# Altium PCB NB3000XN.PcbDoc (part 42 of 71)
Units mil, origin at the board's own origin, x right, y up, seen from the top; angles counter-clockwise.
Board outline 9527.56 x 6929.77 mil, 6 copper layers (Top Layer, GND+SHIELD, MidLayer1, MidLayer2, P2 - 3V3+5V0, Bottom Layer), stack 62.375 mil thick; 832 components, 1027 nets, 4655 pads, 4981 vias.
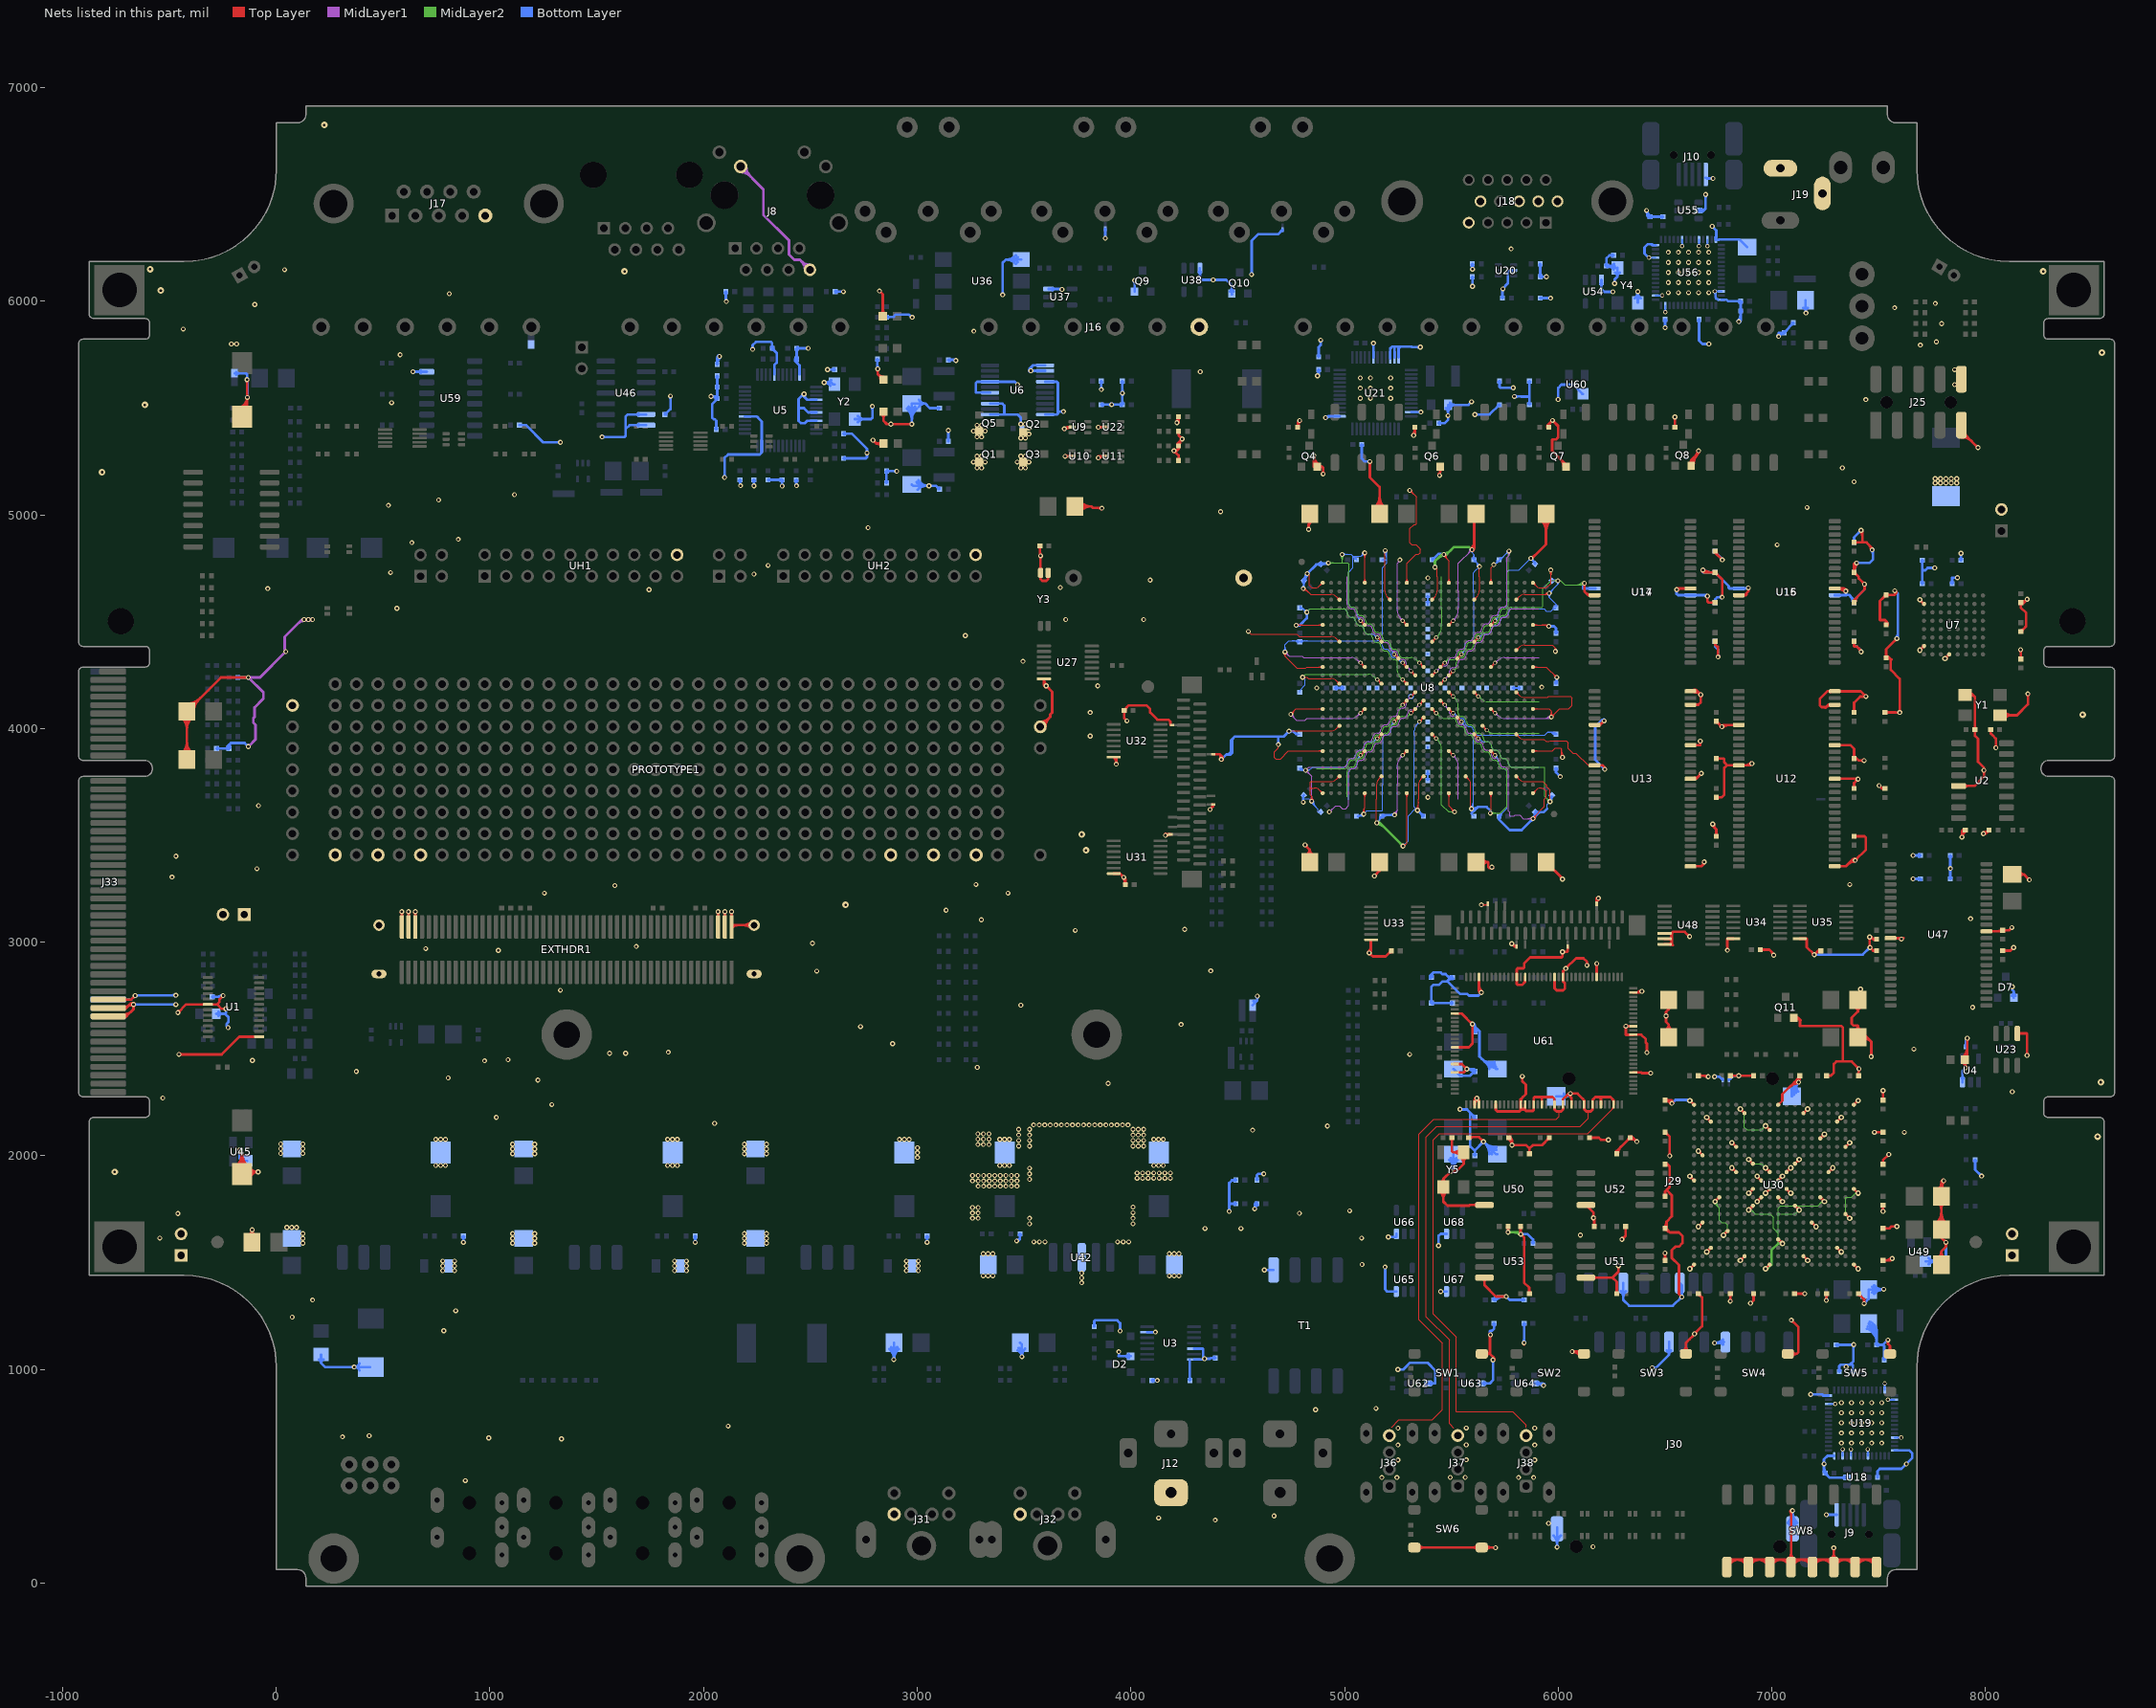
[diagram p46: the nets of this part, all layers, seen from the top]

## Via types
v1: diameter 23, hole 11.81, Top Layer to Bottom Layer, 3672 vias
v2: diameter 26, hole 11.81, Top Layer to Bottom Layer, 461 vias
v3: diameter 19, hole 11.81, Top Layer to Bottom Layer, tented both sides, 396 vias
v4: diameter 23.62, hole 11.81, Top Layer to Bottom Layer, 288 vias
v5: diameter 20, hole 11.81, Top Layer to Bottom Layer, 91 vias
v6: diameter 23, hole 11.81, Top Layer to Bottom Layer, tented both sides, 50 vias
v7: diameter 31, hole 11.81, Top Layer to Bottom Layer, 15 vias
v8: diameter 27.56, hole 11.81, Top Layer to Bottom Layer, tented both sides, 4 vias
v9: diameter 29, hole 11.81, Top Layer to Bottom Layer, 3 vias
v10: diameter 21, hole 11.81, Top Layer to Bottom Layer, 1 vias

## Nets (pads, with @x,y where several pads share a name; then routed paths per layer and width w, separated by ;. In a path a pad name is that pad's centre, name@x,y a point inside that pad or via, vN(x,y) a via of type N, cw(c..) or ccw(c..) an arc to the next point about the centre after c; other vN are vias at no path point) (continued)
GND: (continued)
  Top Layer w12: J33.A40@-785.98,2652.86 -701.48,2652.86 ; J33.A39@-785.98,2692.23 -701.48,2692.23 ; J33.A38@-785.98,2731.6 -678.25,2731.6 v1(-659.81,2750.04) ; J33.A39@-718.03,2688.12 ccw(c-713.87,2706.15) -700.79,2693.07 ; J33.A40@-717.08,2648.64 ccw(c-717.08,2676.13) -697.64,2656.69 ; J33.A40@-717.08,2660.64 ccw(c-717.08,2717.11) -677.16,2677.18 ; J33.A39@-715.33,2699.81 ccw(c-708.13,2731.03) -685.48,2708.37 ; J33.A38@-711.58,2726.1 cw(c-698.3,2712.82) -698.3,2731.6 cw(c-698.3,2750.38) J33.A38@-711.58,2737.1 ; J33.A40@-710.87,2648.18 cw(c-701.48,2641.09) -701.48,2652.86 ; J33.A40@-710.87,2657.54 ccw(c-701.48,2664.63) -701.48,2652.86 ; J33.A39@-710.87,2687.55 cw(c-701.48,2680.46) -701.48,2692.23 ; J33.A39@-710.87,2696.91 ccw(c-701.48,2704) -701.48,2692.23 ; -694.14,2699.71 cw(c-679.79,2685.36) v1@-670.63,2703.47 ; -686.64,2707.21 cw(c-668.14,2688.72) v1@-668.14,2714.87 ; -682.43,2711.42 cw(c-671.92,2700.91) v1@-665.21,2714.17 ; v1@-672.03,2712.26 cw(c-681.42,2721.65) -681.42,2708.37 cw(c-681.42,2695.1) -672.03,2704.49 cw(c-681.42,2695.1) -668.14,2695.1 cw(c-654.86,2695.1) v1@-664.25,2704.49 ; v1@-665.31,2750.04 cw(c-678.59,2750.04) -669.2,2740.65 cw(c-659.81,2731.26) v1@-659.81,2744.54 ; v4(-460,2670) -420.98,2709.02 U1.6@-320,2709.02 -276.78,2709.02 ; v4@-460,2675.81 ccw(c-460,2689.84) -450.08,2679.92 ccw(c-440.16,2670) v4@-454.19,2670 ; v4(-455,2475) -255,2475 -172.17,2557.83 U1.13@-79.84,2557.83 ; v4@-450.89,2470.89 cw(c-440.97,2460.97) -440.97,2475 cw(c-440.97,2489.03) v4@-450.89,2479.11 ; C191.2@-441.59,3882.53 ccw(c-498.56,3939.5) -417.99,3939.5 ; C3.2@-441.59,4052.47 cw(c-498.56,3995.5) -417.99,3995.5 cw(c-337.43,3995.5) C3.2@-394.4,4052.47 ; C191.2@-433.1,3874.05 ccw(c-469.58,3910.53) -417.99,3910.53 ccw(c-366.4,3910.53) C191.2@-402.88,3874.05 ; C3.2@-433.1,4060.95 cw(c-469.58,4024.47) -417.99,4024.47 cw(c-366.4,4024.47) C3.2@-402.88,4060.95 ; C191.2@-417.99,3855 -417.99,4041.71 -418.14,4041.71 -418.14,4080 -418.14,4083.07 -417.99,4083.22 C3.2@-417.99,4080 -258.62,4239.37 v1(-130.48,4239.37) ; -417.99,3939.5 ccw(c-337.43,3939.5) C191.2@-394.4,3882.53 ; C3.2@-417.99,4105.31 ccw(c-417.99,4166.4) -374.79,4123.2 ; C3.2@-417.99,4117.31 ccw(c-417.99,4207.37) -354.3,4143.69 ; C3.2@-396.62,4083.94 cw(c-354.53,4083.94) C3.2@-384.29,4113.7 ; C3.2@-384.62,4083.94 cw(c-313.56,4083.94) -363.81,4134.18 ; v1@-253.98,2750.04 cw(c-267.25,2750.04) -257.86,2740.65 cw(c-248.48,2731.26) v1@-248.48,2744.54 ; v1(-248.48,2750.04) -265.4,2733.12 -265.4,2720.4 -276.78,2709.02 ; v1@-238.36,2684.49 ccw(c-247.75,2675.1) -247.75,2688.37 ccw(c-247.75,2701.65) v1@-238.36,2692.26 ; v1(-234.48,2688.37) -256.14,2688.37 -276.78,2709.02 ; C2.2@-188.68,1947.4 ccw(c-256.93,2016.62) -159.72,2016.62 ; C2.2@-180.26,1938.86 ccw(c-228.64,1987.93) -159.72,1987.93 ccw(c-90.8,1987.93) C2.2@-139.19,1938.86 ; v1@-175.03,2024.15 cw(c-211.99,1987.2) -159.72,1987.2 ; C1.2@-171.72,5502.49 ccw(c-186.17,5550.04) v1@-136.48,5550.04 ; v1(-171.14,2028.04) -159.72,2016.62 ; C1.2@-168.23,5491.01 ccw(c-181.25,5533.85) -136.48,5533.85 ; v1@-166.55,2032.64 cw(c-183.02,2016.17) -159.72,2016.17 ; C1.2@-164.74,5479.53 ccw(c-176.33,5517.66) -136.48,5517.66 ; C1.2@-159.72,5459.09 -136.48,5459.09 v1@-136.48,5550.04 ; v1@-140.36,5629.49 cw(c-149.75,5620.1) -136.48,5620.1 cw(c-123.2,5620.1) v1@-132.59,5629.49 ; C2.2@-137.61,1937.17 ccw(c-111.07,1960.15) -111.07,1925.04 ; C1.2@-136.48,5506.48 ccw(c-116.28,5506.48) C1.2@-130.56,5492.2 ; -136.48,5532.74 cw(c-117.51,5532.74) v1@-130.92,5546.15 ; -136.48,5567.34 ccw(c-117.51,5567.34) v1@-130.92,5553.93 ; v1(-136.48,5633.37) v1@-136.48,5550.04 ; v1@-134.36,4235.49 ccw(c-143.75,4226.1) -143.75,4239.37 ccw(c-143.75,4252.65) v1@-134.36,4243.26 ; C2.2@-133.1,1905.94 cw(c-103.44,1892.47) -103.44,1925.04 ; C2.2@-130.77,1947.4 cw(c-62.52,2016.62) -159.72,2016.62 ; C2.2@-128.54,1945.02 ccw(c-84.81,1982.87) v1(-84.81,1925.04) ; C4.2@-128.45,1628.51 ccw(c-141.8,1654.04) v1@-112.99,1654.04 ; C2.2@-122.17,1900.98 cw(c-84.81,1884.01) v1(-84.81,1925.04) ; v1@-116.7,1650.15 cw(c-125.65,1641.2) -112.99,1641.2 ; C4.2@-112.99,1595 v1@-112.99,1654.04 ; -112.99,1640.32 cw(c-99.09,1640.32) v1@-108.92,1650.15 ; v1(-112.81,1654.04) v1@-112.99,1654.04 ; C4.2@-97.53,1628.51 cw(c-84.18,1654.04) v1@-112.99,1654.04 ; v1@-88.7,1921.15 ccw(c-98.09,1911.76) -98.09,1925.04 ccw(c-98.09,1938.32) v1@-88.7,1928.93 ; v1@-84.81,1924.76 v1(-84.81,1925.04) ; v1@583.97,3139.15 cw(c574.2,3129.38) 588.01,3129.38 ; v1(587.86,3143.04) 588.01,3142.88 EXTHDR1.99@588.01,3071.85 ; 588.01,3130.14 cw(c600.76,3130.14) v1@591.75,3139.15 ; v1@615.46,3139.15 cw(c605.7,3129.38) 619.51,3129.38 ; EXTHDR1.97@619.51,3071.85 v1@619.51,3142.88 ; 619.51,3130.14 cw(c632.25,3130.14) v1@623.24,3139.15 ; v1@646.96,3139.15 cw(c637.19,3129.38) 651.01,3129.38 ; EXTHDR1.95@651.01,3071.85 v1@651.01,3142.88 ; 651.01,3130.14 cw(c663.75,3130.14) v1@654.74,3139.15 ; v1@2064.28,3139.15 cw(c2054.52,3129.38) 2068.33,3129.38 ; EXTHDR1.5@2068.33,3071.85 v1@2068.33,3142.88 ; 2068.33,3130.14 cw(c2081.07,3130.14) v1@2072.06,3139.15 ; v1@2095.78,3139.15 cw(c2086.01,3129.38) 2099.83,3129.38 ; EXTHDR1.3@2099.83,3071.85 v1@2099.83,3142.88 ; 2099.83,3130.14 cw(c2112.57,3130.14) v1@2103.56,3139.15 ; v1@2127.28,3139.15 cw(c2117.51,3129.38) 2131.32,3129.38 ; EXTHDR1.1@2131.32,3071.85 v1@2131.32,3142.88 ; EXTHDR1.1@2131.32,3079.72 EXTHDR1.MH1@2236.94,3079.72 ; 2131.32,3130.14 cw(c2144.07,3130.14) v1@2135.06,3139.15 ; EXTHDR1.1@2134.15,3069.02 cw(c2159.99,3043.18) 2159.99,3079.72 ; EXTHDR1.MH1@2222.39,3065.17 ccw(c2187.27,3030.05) 2187.27,3079.72 ccw(c2187.27,3129.39) EXTHDR1.MH1@2222.39,3094.27 ; v1@2793.19,5344.54 cw(c2793.19,5331.26) 2802.58,5340.65 cw(c2811.97,5350.04) v1@2798.69,5350.04 ; v1(2793.19,5350.04) 2809.52,5333.71 ; v1@2811.3,5679.49 cw(c2801.91,5670.1) 2815.19,5670.1 cw(c2828.47,5670.1) v1@2819.08,5679.49 ; v1(2815.19,5683.37) 2815.19,5660.15 LED5.2@2842.08,5633.26 ; v1(2823.52,6048.37) 2839.27,6032.63 LED4.2@2839.27,5930 ; LED5.2@2828.4,5633.26 ccw(c2795.36,5633.26) 2818.72,5656.62 ccw(c2842.08,5679.99) LED5.2@2842.08,5646.95 ; LED4.2@2829.6,5939.68 ccw(c2806.23,5963.04) 2839.27,5963.04 ccw(c2872.31,5963.04) LED4.2@2848.95,5939.68 ; LED7.2@2832.37,5324.12 ccw(c2809.52,5301.69) 2809.52,5333.71 ; LED7.2@2832.37,5343.3 cw(c2809.52,5365.74) 2809.52,5333.71 ; LED6.2@2832.41,5473.79 cw(c2809.04,5450.43) 2842.08,5450.43 cw(c2875.12,5450.43) LED6.2@2851.76,5473.79 ; LED6.2@2842.08,5483.47 2842.08,5440.99 2858.07,5425 v1(2975,5425) ; LED7.2@2842.14,5333.71 2809.52,5333.71 ; v1@2971.11,5421.11 ccw(c2961.72,5411.72) 2961.72,5425 ccw(c2961.72,5438.28) v1@2971.11,5428.89 ; C116.2@3570.22,4850.89 cw(c3560.3,4840.97) 3574.33,4840.97 cw(c3588.36,4840.97) C116.2@3578.44,4850.89 ; Y3.3@3573.17,4713.1 cw(c3563.25,4703.17) 3577.28,4703.17 cw(c3591.31,4703.18) Y3.3@3581.39,4713.1 ; Y3.3@3573.17,4744.94 ccw(c3563.25,4754.86) 3577.28,4754.86 ccw(c3591.31,4754.85) Y3.3@3581.39,4744.94 ; v1@3573.4,4804.73 cw(c3564.01,4795.34) 3577.28,4795.34 cw(c3590.56,4795.34) v1@3581.17,4804.73 ; 3574.33,4829.02 ccw(c3597.69,4829.02) v1@3581.17,4812.5 ; C116.2@3574.33,4855 3574.33,4811.57 v1(3577.28,4808.61) Y3.3@3577.28,4729.02 3577.28,4700.04 3585.62,4691.71 3604.38,4691.71 3612.72,4700.04 Y3.2@3612.72,4729.02 ; TP8.1@3576.12,4008.23 3623.09,4055.2 3623.09,4065.94 3631.86,4074.71 3631.86,4172.04 v1(3603.86,4200.04) ; TP8.1@3576.12,4032.23 ccw(c3576.12,4090.18) 3617.09,4049.21 ccw(c3658.06,4008.23) TP8.1@3600.12,4008.23 ; 3592.8,4209.18 ccw(c3610.73,4209.18) v1@3599.95,4194.85 ; v1@3598.52,4200.04 v1(3603.86,4200.04) ; v1@3603.86,4194.54 cw(c3603.86,4181.26) 3613.25,4190.65 cw(c3622.64,4200.04) v1@3609.36,4200.04 ; v1@3607.16,4204.44 cw(c3628.82,4233.23) U27.7@3592.8,4233.23 3592.8,4211.1 v1(3603.86,4200.04) ; Y3.2@3608.61,4713.1 cw(c3598.69,4703.17) 3612.72,4703.17 cw(c3626.74,4703.18) Y3.2@3616.83,4713.1 ; v1@3689.9,5397.84 cw(c3716.14,5371.6) U9.2@3716.14,5408.72 ; v1@3692.31,5274.49 v1(3692.19,5274.37) U10.2@3725,5274.41 ; v1@3692.31,5400.26 3702.64,5410.59 U9.2@3725,5410.59 ; v1@3695.89,5403.84 cw(c3709.89,5389.84) U9.2@3715.6,5408.8 ; v1@3696.08,5270.49 cw(c3705.55,5261.01) 3705.55,5274.41 ; v1@3696.08,5278.26 ccw(c3705.39,5287.57) 3705.39,5274.41 ; C115.2@3737.99,5040 3814.23,5040 ; C115.2@3753.69,5025.5 cw(c3786.81,4994.92) 3786.81,5040 cw(c3786.81,5085.08) C115.2@3753.69,5054.5 ; C115.2@3762.51,5017.36 cw(c3814.23,4969.6) 3814.23,5040 ; C115.2@3762.51,5062.64 ccw(c3814.23,5110.4) 3814.23,5040 ; 3846.42,5033.37 cw(c3846.42,5013.27) v1@3860.64,5027.49 ; v1(3847.19,5267.04) v1@3847.19,5274.37 ; v1(3847.19,5410.71) 3847.31,5410.59 U22.2@3880,5410.59 ; v1@3847.22,5274.41 U11.2@3880,5274.41 ; v1@3851.08,5263.15 cw(c3878.26,5235.97) U11.2@3878.26,5274.41 ; v1@3851.08,5406.82 cw(c3860.18,5397.71) 3860.18,5410.59 ; v1@3851.08,5414.6 ccw(c3860.75,5424.27) 3860.75,5410.59 ; v1(3864.52,5031.37) 3856.19,5031.37 3854.19,5033.37 3820.86,5033.37 3814.23,5040 ; U31.7@3920,3321.46 3949.11,3321.46 v1(3966.86,3303.71) 3974.33,3296.23 C124.1@3974.33,3270 ; U32.7@3926.46,3865 3931.86,3859.6 v1(3931.86,3833.37) ; U32.7@3926.46,3866.46 U32.7@3920,3866.46 ; v1@3927.97,3837.26 ccw(c3918.58,3846.65) 3931.86,3846.65 ccw(c3945.14,3846.65) v1@3935.75,3837.26 ; U32.7@3928.54,3862.92 ccw(c3920,3854.39) U32.7@3920,3866.46 ; v1@3931.86,3837.83 ccw(c3891.37,3837.83) U32.7@3920,3866.46 ; 3931.86,3852.76 ccw(c3918.02,3852.76) U32.7@3920,3866.46 ; v1@3961.36,3303.71 ccw(c3948.08,3303.71) 3957.47,3313.1 ccw(c3966.86,3322.49) v1@3966.86,3309.21 ; v1@3962.97,3299.82 cw(c3935.54,3272.39) C124.1@3974.33,3272.39 ; 3969.19,4070.63 cw(c3983.7,4070.63) 3973.44,4080.89 ccw(c3983.36,4070.97) 3969.33,4070.97 ccw(c3955.3,4070.97) 3965.22,4080.89 cw(c3955.64,4071.31) 3969.19,4071.31 ; 3969.33,4056.71 C121.1@3969.33,4085 ; C124.1@3970.22,3274.11 ccw(c3960.3,3284.03) 3974.33,3284.03 ccw(c3988.36,3284.03) C124.1@3978.44,3274.11 ; C121.1@3975.14,4085 cw(c3995.24,4085) 3981.03,4099.21 ; v1(3981.86,4036.04) 3969.19,4048.71 3969.19,4085 3969.19,4087.37 3990.19,4108.37 4073.52,4108.37 4090.19,4091.71 4090.19,4075.04 4123.52,4041.71 4176.67,4041.71 4185,4033.37 NT28.2@4185,4020 ; v1(4161.86,3500.04) 4161.86,3508.33 4165.19,3505 NT31.2@4185,3505 ccw(c4185,3479.67) v1@4165.99,3496.41 ; 4185,4022.71 ccw(c4193.8,4022.71) NT28.2@4187.58,4016.49 ; v1@4201.86,5294.54 cw(c4201.86,5281.26) 4211.25,5290.65 cw(c4220.64,5300.04) v1@4207.36,5300.04 ; v1@4204.22,5305.01 ccw(c4211.64,5320.55) 4223.82,5308.37 ; v1@4212.18,5436.41 ccw(c4194.09,5460) R124.1@4223.82,5460 ; v1(4215.52,5432.04) 4216.86,5433.37 4222.78,5433.37 4223.82,5434.41 R124.1@4223.82,5460 ; R93.1@4217.17,5323.16 cw(c4234.81,5324.92) 4222.28,5337.46 ; R95.1@4220.06,5259.25 ccw(c4210.98,5268.33) 4223.82,5268.33 ccw(c4236.66,5268.33) R95.1@4227.58,5259.25 ; R93.1@4220.06,5319.08 cw(c4210.98,5310) 4223.82,5310 ; R93.1@4220.06,5327.59 ccw(c4210.98,5336.67) 4223.82,5336.67 ccw(c4236.66,5336.67) R93.1@4227.58,5327.59 ; R91.1@4220.06,5387.41 cw(c4210.98,5378.33) 4223.82,5378.33 cw(c4236.66,5378.33) R91.1@4227.58,5387.41 ; R124.1@4220.06,5455.75 cw(c4210.98,5446.67) 4223.82,5446.67 cw(c4236.66,5446.67) R124.1@4227.58,5455.75 ; R95.1@4223.82,5255 4223.82,5278.08 v1(4201.86,5300.04) 4215.49,5300.04 4223.82,5308.37 ; 4223.82,5310 cw(c4236.66,5310) R93.1@4227.58,5319.08 ; R91.1@4223.82,5391.67 4223.82,5371.71 4228.82,5366.71 ; 4228.86,5366.71 v1(4240.19,5355.37) ; R93.1@4229.11,5324.35 cw(c4267.39,5328.17) v1(4240.19,5355.37) ; 4230.74,5364.79 ccw(c4240.19,5374.24) v1@4240.19,5360.87 ; 4230.83,5364.7 cw(c4221.5,5355.37) 4234.69,5355.37 cw(c4221.41,5355.37) 4230.8,5345.99 cw(c4240.19,5336.6) v1@4240.19,5349.87 ; v1(4370.52,3621.37) 4385,3635.85 NT30.2@4385,3645 ; v1@4377.35,3628.2 ccw(c4366.65,3638.9) NT30.2@4380.5,3645 ; NT29.2@4385,3880 4414.86,3880 4418.86,3876 ; 4418.86,3876 ccw(c4438.69,3876) v1@4426.82,3860.11 ; 4425.76,3869.1 cw(c4414.72,3858.06) v1@4429.8,3854.03 ; R97.1@4777.42,5414.25 ccw(c4768.34,5423.33) 4781.18,5423.33 ccw(c4794.02,5423.33) R97.1@4784.94,5414.25 ; R97.1@4781.18,5408.75 cw(c4820.38,5408.75) v1@4793.9,5437.65 ; R97.1@4781.18,5410 4781.18,5432.71 v1(4790.19,5441.71) ; v1@4815.19,3450.21 cw(c4815.19,3436.93) 4824.58,3446.32 cw(c4833.97,3455.71) v1@4820.69,3455.71 ; v1(4815.19,3455.71) 4837.01,3433.89 ; C278.2@4821.62,3408.55 ccw(c4808.45,3433.89) 4837.01,3433.89 ; v1@4827.97,4936.26 ccw(c4818.58,4945.65) 4831.86,4945.65 ccw(c4845.14,4945.65) v1@4835.75,4936.26 ; C276.2@4830.3,4968.37 cw(c4828.61,4960.15) 4837.01,4960.15 ; v1(4831.86,4932.37) 4831.86,4955 4837.01,4960.15 ; C278.2@4837.01,3375 4837.01,3433.89 ; C276.2@4837.01,5005 4837.01,4960.15 ; C276.2@4843.71,4968.37 ccw(c4845.4,4960.15) 4837.01,4960.15 ; C278.2@4852.4,3408.55 cw(c4865.57,3433.89) 4837.01,3433.89 ; v1@4852.97,5273.82 cw(c4843.58,5264.43) 4856.86,5264.43 cw(c4870.14,5264.43) v1@4860.75,5273.82 ; Q4.3@4856.86,5225.79 v1(4856.86,5277.71) ccw(c4906.35,5277.71) Q4.3@4878.9,5236.52 ; 4856.86,5255.29 ccw(c4891.41,5255.29) Q4.3@4872.24,5226.54 ; Q4.3@4872.22,5225.02 cw(c4883.53,5211.12) 4896.21,5223.79 ; Q4.3@4872.28,5225.06 cw(c4882.73,5203.89) 4899.42,5220.58 ; Q4.3@4872.4,5225.79 4894.21,5225.79 ; Q4.3@4882.17,5219.32 cw(c4894.21,5211.35) 4894.21,5225.79 ; Q4.3@4882.17,5232.26 ccw(c4894.21,5240.23) 4894.21,5225.79 ; v1@4895.97,5195.6 ccw(c4886.58,5204.99) 4899.86,5204.99 ccw(c4913.14,5204.99) v1@4903.75,5195.6 ; v1(4899.86,5191.71) 4899.86,5220.14 4894.21,5225.79 ; v1@5111.3,2953.93 ccw(c5081.79,2983.44) 5123.52,2983.44 ; v1@5114.97,5246.15 cw(c5105.58,5236.76) 5118.86,5236.76 cw(c5132.14,5236.76) v1@5122.75,5246.15 ; v1@5115.19,2944.54 cw(c5115.19,2931.26) 5124.58,2940.65 cw(c5133.97,2950.04) v1@5120.69,2950.04 ; v1(5118.86,5250.04) 5118.86,5176.14 5164.33,5130.67 5164.33,5107.04 C260.2@5164.33,5005 ; U33.7@5123.52,3011.46 5123.52,2958.37 v1(5115.19,2950.04) 5131.86,2933.37 5192.71,2933.37 C122.1@5219.33,2960 ; v1(5140,3310) 5164.33,3334.33 C265.2@5164.33,3375 ; v1@5140,3315.5 ccw(c5140,3328.78) 5149.39,3319.39 ccw(c5158.78,3310) v1@5145.5,3310 ; C260.2@5140.73,5032.53 ccw(c5083.77,5089.5) 5164.33,5089.5 ; C260.2@5149.22,5024.05 ccw(c5112.74,5060.53) 5164.33,5060.53 ccw(c5215.92,5060.53) C260.2@5179.44,5024.05 ; 5164.33,5089.5 ccw(c5244.89,5089.5) C260.2@5187.93,5032.53 ; C122.1@5213.52,2960 cw(c5199.49,2960) 5209.41,2950.08 cw(c5219.33,2940.16) C122.1@5219.33,2954.19 ; v1@5319.64,5376.26 ccw(c5297.46,5398.44) R126.1@5328.82,5398.44 ; v1(5323.52,5372.37) 5323.52,5370.37 5323.82,5370.37 5324.67,5371.23 5328.82,5375.37 R126.1@5328.82,5410 ; R126.1@5325.06,5405.75 cw(c5315.98,5396.67) 5328.82,5396.67 cw(c5341.66,5396.67) R126.1@5332.58,5405.75 ; SW6.3@5327.13,166.81 5392.63,166.81 5392.52,166.71 5598.52,166.71 5598.52,166.81 ; SW6.3@5344.79,155.14 cw(c5372.96,126.98) 5372.96,166.81 cw(c5372.96,206.65) SW6.3@5344.79,178.48 ; Q6.3@5439.45,5216.19 cw(c5422.7,5198.04) 5447.4,5198.04 ; v1@5441.11,5188.89 ccw(c5425.92,5204.08) 5447.4,5204.08 ; v1(5445,5185) 5441.82,5185 5440.19,5183.37 5440.19,5191.04 5440.4,5191.04 5447.4,5198.04 ; Y5.2@5447.3,1834.3 cw(c5410.59,1797.59) 5462.5,1797.59 cw(c5514.41,1797.59) Y5.2@5477.7,1834.3 ; Q6.3@5447.4,5225.79 5447.4,5198.04 ; Y5.2@5453.02,1876.8 ccw(c5445.55,1892.02) 5462.5,1892.02 ; Q6.3@5455.35,5216.19 ccw(c5472.11,5198.04) 5447.4,5198.04 ; Y5.2@5471.98,1876.8 cw(c5479.46,1892.02) 5462.5,1892.02 ; v1@5493.02,1928.04 cw(c5479.75,1928.04) 5489.14,1918.65 cw(c5498.52,1909.26) v1@5498.52,1922.54 ; C157.1@5498.56,2080.89 cw(c5488.64,2070.97) 5502.67,2070.97 cw(c5516.7,2070.97) C157.1@5506.78,2080.89 ; v1@5502.41,1924.15 cw(c5511.8,1914.76) 5511.8,1928.04 cw(c5511.8,1941.32) v1@5502.41,1931.93 ; C157.1@5502.67,2085 5502.67,2022.33 5508.5,2016.5 ; U61.123@5516.83,2390.4 5556.55,2390.4 v1(5572.52,2406.37) 5549.13,2429.77 U61.121@5516.83,2429.77 ; U61.117@5516.83,2508.51 5548.52,2508.51 5548.52,2508.37 5581.86,2508.37 5598.52,2525.04 v1(5598.52,2616.71) 5549.24,2665.99 U61.109@5516.83,2665.99 ; Y5.4@5541.68,2001.94 ccw(c5508.5,1971.42) 5508.5,2016.5 ; Y5.4@5541.68,2031.06 cw(c5508.5,2061.58) 5508.5,2016.5 ; Y5.4@5542.6,1997 cw(c5508.99,1962.02) 5557.5,1962.02 ; Y5.4@5572.4,1997 ccw(c5606.01,1962.02) 5557.5,1962.02 ; v1@5572.52,2400.87 ccw(c5572.52,2387.6) 5563.14,2396.99 ccw(c5553.75,2406.37) 5567.02,2406.37 ccw(c5553.75,2406.37) 5563.14,2415.76 ccw(c5572.52,2425.15) v1@5572.52,2411.87 ; C169.1@5580.67,2085 5583.54,2087.87 5629.36,2087.87 v1(5650.52,2066.71) ; C169.1@5584.78,2080.89 cw(c5601.64,2064.03) 5601.64,2087.87 ; v1@5592.3,4840.93 ccw(c5557.16,4876.07) 5606.86,4876.07 ; v1@5593.02,2616.71 ccw(c5579.75,2616.71) 5589.14,2626.1 ccw(c5598.52,2635.49) v1@5598.52,2622.21 ; v1@5594.64,2612.82 cw(c5585.25,2603.43) 5598.52,2603.43 cw(c5611.8,2603.43) v1@5602.41,2612.82 ; v1(5596.19,4837.04) 5606.86,4847.71 C267.2@5606.86,5000.04 ; v1@5600.79,4832.44 ccw(c5586.13,4847.1) 5606.86,4847.1 ; U61.3@5609.37,2238.17 cw(c5642.58,2238.17) v4@5623.36,2265.26 ; U61.3@5609.37,2240 5609.37,2260.37 v4@5620,2260.37 ; 5609.37,2261.4 cw(c5626.1,2261.4) v4@5616.42,2275.05 ; 5611.72,2260.37 cw(c5611.72,2235.85) U61.4@5629.06,2253.19 ; C266.2@5615.67,3375 5671.48,3375 ; v4@5616.32,2265.5 cw(c5594.41,2238.66) U61.4@5629.06,2238.66 ; U50.4@5619.97,1764.5 ccw(c5606.69,1751.22) 5606.69,1770 ccw(c5606.69,1788.78) U50.4@5619.97,1775.5 ; v4(5620,2270) v4@5620,2260.37 ; SW6.4@5624.41,155.56 ccw(c5598.53,131.41) 5598.53,166.81 ; SW6.4@5624.41,178.07 cw(c5598.53,202.21) 5598.53,166.81 ; v4@5626.71,2260.37 ccw(c5626.71,2235.85) U61.3@5609.37,2253.19 ; U61.4@5629.06,2240 5629.06,2260.37 v4@5620,2260.37 ; 5629.06,2775.57 ccw(c5651.38,2775.57) v1@5635.59,2759.78 ; 5629.06,2804.54 ccw(c5680.35,2804.54) v1@5644.08,2768.26 ; U61.99@5629.06,2837.34 5629.06,2775.51 v1(5640.19,2764.37) ; SW1.3@5642.87,1073.58 5680.86,1073.58 ; v1@5645.02,2066.71 ccw(c5631.75,2066.71) 5641.14,2076.1 ccw(c5650.52,2085.49) v1@5650.52,2072.21 ; C266.2@5645.06,3359.21 cw(c5671.48,3345.01) 5671.48,3375 ; C266.2@5645.07,3390.79 ccw(c5671.48,3404.99) 5671.48,3375 ; U53.4@5649.5,1424.5 cw(c5636.22,1411.22) 5655,1411.22 cw(c5673.78,1411.22) U53.4@5660.5,1424.5 ; U53.4@5655,1430 5655,1395 5708.29,1341.71 v1(5756.86,1341.71) ; U50.4@5655,1770 5585.86,1770 5582.86,1767 5582.86,1766.71 5481.83,1766.71 5462.5,1786.04 Y5.2@5462.5,1853.5 Y5.2@5462.5,1855.99 ; SW6.4@5660.15,155.14 cw(c5688.31,126.98) 5688.31,166.81 cw(c5688.32,206.65) SW6.4@5660.15,178.48 ; SW1.3@5662.32,1064.02 cw(c5680.86,1050.84) 5680.86,1073.58 ; SW1.3@5662.32,1083.15 ccw(c5680.86,1096.33) 5680.86,1073.58 ; 5671.86,3375.04 5673.52,3373.37 5673.52,3351.71 ; 5673.52,3350.71 5677.52,3346.71 5690,3346.71 5695,3346.71 v4(5690,3351.71) ; 5680.86,1143.66 cw(c5701.57,1143.66) v1@5686.92,1158.3 ; v1(5683.03,1162.19) 5683.03,1165.53 5680.86,1167.71 5680.86,1073.58 ; 5690.92,166.81 cw(c5690.92,149.77) v1@5702.97,161.82 ; v1(5695,1045) 5695,1059.44 5680.86,1073.58 ; 5695.89,1058.55 cw(c5682.33,1045) v1@5701.5,1045 ; v1(5706.86,165.71) 5707.96,166.81 5706.86,166.81 SW6.4@5642.48,166.81 5598.52,166.81 ; U61.8@5707.8,2226.81 ccw(c5717.39,2221.61) 5709.67,2213.89 ; U61.8@5707.79,2240 5707.8,2217.37 5707.13,2216.71 5706.86,2216.71 5715.19,2208.37 5819.95,2208.37 5823.52,2211.95 ; v1@5752.97,1337.82 ccw(c5743.58,1328.43) 5743.58,1341.71 ccw(c5743.58,1354.99) v1@5752.97,1345.6 ; v1@5761.45,1646.26 ccw(c5751.25,1656.46) 5765.67,1656.46 ; C158.2@5761.56,1665.89 cw(c5751.64,1655.97) 5765.67,1655.97 cw(c5779.7,1655.97) C158.2@5769.78,1665.89 ; v1(5765.34,1642.37) 5765.67,1642.71 C158.2@5765.67,1670 ; 5765.67,1654.85 ccw(c5777.81,1654.85) v1@5769.22,1646.26 ; C187.2@5766.19,2080.16 cw(c5744.22,2047.18) v1@5783.86,2047.18 ; C187.2@5769.37,2079.19 cw(c5769.24,2064.57) 5783.86,2064.57 ; C187.2@5769.41,2079.19 cw(c5769.41,2065.16) 5779.33,2075.08 cw(c5789.26,2085) C187.2@5775.23,2085 ; C187.2@5769.41,2085 5783.86,2070.56 v1(5783.86,2050.04) 5850.17,2050.04 5865.67,2034.54 ; C187.2@5772.84,2090.15 cw(c5759.15,2069.59) 5783.86,2069.59 ; v1@5779.97,2053.93 ccw(c5770.58,2063.32) 5783.86,2063.32 ccw(c5797.14,2063.32) 5787.75,2053.93 ccw(c5797.14,2063.32) 5797.14,2050.04 ccw(c5797.14,2036.76) v1@5787.75,2046.15 ; v1@5782.86,2993 5795.86,2980 NT41.2@5805,2980 ; v1@5789.68,2986.18 ccw(c5798.38,2994.88) NT41.2@5805,2984.5 ; C164.2@5820.22,1665.89 cw(c5810.3,1655.97) 5824.33,1655.97 cw(c5838.36,1655.97) C164.2@5828.44,1665.89 ; U61.14@5823.52,2221.06 cw(c5831.65,2221.06) 5825.91,2226.81 ccw(c5843.59,2236.49) 5843.59,2216.33 ; U61.14@5823.52,2258.94 ccw(c5831.65,2258.94) 5825.91,2253.19 cw(c5857.84,2253.19) 5835.26,2275.78 ; 5824.33,1648.73 ccw(c5840.54,1648.73) v1@5829.08,1637.26 ; C164.2@5824.33,1670 5824.33,1642.57 5825.19,1641.71 v1(5825.19,1633.37) 5840.19,1618.37 5840.19,1406.71 5863.52,1383.37 5863.67,1383.37 5864.6,1382.45 ; U61.14@5825.9,2240 5825.91,2214.33 ; v1@5827.97,2368.49 cw(c5818.58,2359.1) 5831.86,2359.1 cw(c5845.14,2359.1) v1@5835.75,2368.49 ; v1(5831.86,2372.37) 5831.86,2350.04 5848.52,2333.37 5848.52,2289.04 5823.52,2264.04 5823.52,2211.95 ; 5839.44,2809.29 ccw(c5824.58,2824.14) U61.88@5845.59,2824.14 ; v1@5840.19,1116.71 v1(5840.19,1125.04) ; U61.15@5845.59,2226.81 cw(c5827.91,2236.49) 5827.91,2216.33 ; U61.15@5845.59,2240 5845.59,2214.33 ; U61.88@5845.59,2837.34 5845.59,2815.44 5830.19,2800.04 5809.86,2800.04 5806.22,2803.68 U61.90@5806.22,2837.34 5806.22,2873.37 5810.22,2877.37 5836.52,2877.37 5840.19,2881.04 5840.19,2900.37 5869.19,2929.37 6016.19,2929.37 6020,2933.18 v4(6020,2955) ; 5861.52,2038.71 5869.84,2038.71 ; C165.1@5861.56,1359.11 ccw(c5851.64,1369.03) 5865.67,1369.03 ccw(c5879.7,1369.03) 5869.78,1359.11 cw(c5884.88,1374.21) 5863.52,1374.21 ; C159.1@5861.56,2014.11 ccw(c5851.64,2024.03) 5865.67,2024.03 ccw(c5879.7,2024.03) C159.1@5869.78,2014.11 ; C165.1@5863.52,1352.85 5863.52,1355 5863.52,1381.37 5864.6,1382.45 ; C165.1@5865.67,1355 5865.67,1381.37 ; C159.1@5865.67,2010 5865.67,2034.54 ; v1(5872.19,4797.04) 5877.45,4797.04 5942.99,4862.59 C277.2@5942.99,5005 ; v1@5872.19,4802.54 ccw(c5872.19,4828.51) 5890.55,4810.15 ; C277.2@5919.4,4977.47 cw(c5862.43,4920.5) 5942.99,4920.5 cw(c6023.55,4920.5) C277.2@5966.59,4977.47 ; U61.19@5924.33,2240 5924.33,2275.04 ; C277.2@5927.88,4985.95 cw(c5891.4,4949.47) 5942.99,4949.47 cw(c5994.58,4949.47) C277.2@5958.1,4985.95 ; C279.2@5943.52,3340.37 C279.2@5943.52,3374.47 ; R257.2@5948.77,2075.08 cw(c5958.69,2065.16) R257.2@5958.69,2079.19 ; R257.2@5949.96,2076.27 ccw(c5941.72,2084.51) R257.2@5953.37,2084.51 ; R128.1@5950.15,5407.61 cw(c5961.06,5412.82) R128.1@5952.51,5421.37 ; R128.1@5952.42,5414.25 ccw(c5943.34,5423.33) 5956.18,5423.33 ccw(c5969.02,5423.33) R128.1@5959.94,5414.25 ; R128.1@5956.18,5410 5956.18,5425.04 5964.51,5433.37 ; R257.2@5958.69,2085 5923.69,2050 5881.13,2050 5869.84,2038.71 ; R128.1@5960.98,5412.78 cw(c5977.31,5420.58) 5964.51,5433.37 ; 5964.12,5432.98 cw(c5973.53,5423.57) 5973.52,5436.87 cw(c5973.52,5423.6) 5982.91,5432.99 cw(c5992.3,5442.37) v1@5979.02,5442.37 ; 5964.14,5433 ccw(c5954.77,5442.37) v1@5968.02,5442.37 ; U61.22@5983.39,2226.81 ccw(c5996.07,2222.82) 5986.67,2213.42 ; U61.22@5983.38,2240 5983.39,2216.71 ; U61.81@5983.38,2837.34 5983.39,2784.85 5993.19,2775.04 6023.52,2775.04 6031.86,2783.37 6031.86,2808.37 6026.86,2813.37 ; 6007.96,3310.03 cw(c5992.94,3295) v4@6014.19,3295 ; 6012.17,5259.39 cw(c5979.55,5226.77) Q7.3@6025.69,5226.77 ; v4@6015.89,2950.89 cw(c6005.97,2940.97) 6020,2940.97 cw(c6034.03,2940.97) 6024.11,2950.89 cw(c6034.03,2940.97) 6034.03,2955 cw(c6034.03,2969.03) v4@6024.11,2959.11 ; v4@6016.19,2951.19 v4(6020,2955) ; 6019.47,2213.42 ccw(c6010.07,2222.82) U61.24@6022.75,2226.81 ; v4(6020,3295) 6020,3297.99 C279.2@5943.52,3374.47 ; U61.24@6022.76,2240 6022.76,2216.71 ; U61.79@6022.75,2824.14 ccw(c6038.85,2824.14) 6027.47,2812.76 ; U61.79@6022.76,2837.34 6022.76,2817.37 6026.76,2813.37 6026.86,2813.37 ; 6034.21,2276.83 cw(c6056.86,2254.17) v1@6056.86,2286.21 ; v1@6035.52,2882.54 ccw(c6035.52,2895.82) 6044.91,2886.43 ccw(c6054.3,2877.04) v1@6041.02,2877.04 ; Q7.3@6037.4,5225.79 6037.4,5226.77 6040.19,5226.77 6040.19,5231.37 5971.52,5300.04 5971.52,5351.04 5973.52,5353.04 5990.19,5353.04 5999.86,5362.71 5999.86,5416.04 v1(5973.52,5442.37) 5964.52,5433.37 ; NT38.2@6045,2980 6045,2958.18 6041.82,2955 v4(6020,2955) ; v1@6060.75,2287.82 cw(c6070.14,2278.43) 6070.14,2291.71 cw(c6070.14,2304.99) v1@6060.75,2295.6 ; U61.26@6062.12,2240 6062.13,2271.71 6057.13,2276.71 6056.86,2276.71 v1(6056.86,2291.71) ; v1@6069.08,1079.82 cw(c6078.47,1070.43) 6078.47,1083.71 cw(c6078.47,1096.99) v1@6069.08,1087.6 ; 6087.36,1083.71 cw(c6087.36,1055.94) SW2.3@6110.61,1071.12 ; SW2.3@6100.56,1064.56 ccw(c6065.19,1041.47) v1(6065.19,1083.71) 6110.25,1083.71 SW2.3@6120.37,1073.58 ; 6115.86,2266.04 cw(c6103.01,2253.19) U61.29@6121.18,2253.19 ; v1@6118.64,4676.82 cw(c6109.25,4667.43) 6122.52,4667.43 cw(c6135.8,4667.43) v1@6126.41,4676.82 ; v1(6122.52,4680.71) 6122.52,4641.92 6140.19,4624.25 U17.12@6170.59,4624.25 ; U61.29@6123.52,2221.15 ccw(c6115.52,2221.15) 6121.18,2226.81 ccw(c6139.9,2226.81) 6126.66,2213.57 ; U61.29@6123.52,2240 6123.52,2216.71 6131.86,2208.37 6140,2208.37 6152.22,2208.37 6160.55,2216.71 ; U61.29@6123.52,2241.71 6123.52,2258.37 6090.19,2291.71 v1(6056.86,2291.71) ; 6128.95,4635.5 ccw(c6147.61,4654.16) U17.12@6152.32,4628.19 ; U51.4@6130,1430 6255,1430 ; U52.4@6130,1770 6165,1735 v1(6165,1710) 6169.33,1705.67 C160.2@6169.33,1670 ; v1@6130.97,2895.6 ccw(c6121.58,2904.99) 6134.86,2904.99 ccw(c6148.14,2904.99) v1@6138.75,2895.6 ; v1(6134.86,2891.71) 6134.86,2908.04 6117.86,2925.04 6083.52,2925.04 v1(6035.52,2877.04) 6023.52,2865.04 6023.52,2837.34 6023.52,2816.71 6026.86,2813.37 ; R258.2@6148.52,2085 R258.2@6147.44,2085 6190,2085 6200,2075 v1(6235,2075) ; R258.2@6151.2,2081.24 cw(c6160.28,2072.16) 6160.28,2085 cw(c6160.28,2097.84) R258.2@6151.2,2088.76 ; 6157.27,2213.42 ccw(c6147.87,2222.82) U61.31@6160.55,2226.81 ; U61.31@6160.55,2240 6160.55,2216.71 ; U61.31@6160.55,2253.19 cw(c6180.37,2253.19) 6166.35,2267.2 ; v1@6161.11,1706.11 cw(c6141.27,1686.27) 6169.33,1686.27 ; v1@6161.11,1713.89 ccw(c6151.72,1723.28) 6165,1723.28 ccw(c6178.28,1723.28) v1@6168.89,1713.89 ; U51.4@6165.03,1424.5 cw(c6178.31,1411.22) 6178.31,1430 cw(c6178.31,1448.78) U51.4@6165.03,1435.5 ; C160.2@6165.22,1674.11 ccw(c6155.3,1684.03) 6169.33,1684.03 ccw(c6183.36,1684.03) C160.2@6173.44,1674.11 ; U13.12@6170.59,3827.99 6208.19,3827.99 v1@6218.52,3817.66 ; U13.6@6170.59,4016.97 6196.12,4016.97 v1(6215.19,4036.04) ; v1@6176.64,2896.15 cw(c6167.94,2887.46) 6180.24,2887.46 ; NT39.2@6180,3178.66 cw(c6208.9,3178.66) v1@6191.78,3201.94 ; NT39.2@6180,3180 6180,3206.37 6180,3206.56 6180.19,3206.37 v1(6188.52,3206.37) ; U61.71@6180.24,2837.34 6180.24,2891.71 6180.52,2891.71 v1(6180.52,2900.04) ; 6180.24,2886.06 cw(c6194.5,2886.06) v1@6184.41,2896.15 ; U13.6@6188.15,4020.97 ccw(c6188.15,4049.86) v1@6208.58,4029.43 ; U61.33@6199.92,2240 6199.92,2266.71 6191.59,2275.04 ; v1@6209.69,4036.04 cw(c6196.41,4036.04) 6205.8,4026.65 cw(c6215.19,4017.26) v1@6215.19,4030.54 ; v1@6231.11,2071.11 ccw(c6221.72,2061.72) 6221.72,2075 ccw(c6221.72,2088.28) v1@6231.11,2078.89 ; 6253.27,2266.96 cw(c6239.51,2253.19) U61.36@6258.97,2253.19 ; U61.36@6258.97,2240 6258.98,2261.26 6245.19,2275.04 6191.59,2275.04 ; C162.2@6268.14,2010 cw(c6284.95,2010) 6273.06,2021.88 ; C161.1@6270.22,1359.11 ccw(c6260.3,1369.03) 6274.33,1369.03 ccw(c6288.36,1369.03) C161.1@6278.44,1359.11 ; C162.2@6270.42,2014.3 ccw(c6262.36,2023.15) 6274.33,2023.15 ccw(c6286.3,2023.15) C162.2@6278.24,2014.3 ; C161.1@6274.33,1355 6274.33,1410.67 6255,1430 ; C162.2@6274.33,2010 6274.33,2023.15 R259.2@6336.18,2085 6350.23,2085 v1(6368.52,2066.71) ; v1@6278.11,1482.11 cw(c6268.72,1472.72) 6282,1472.72 cw(c6295.28,1472.72) v1@6285.89,1482.11 ; C162.2@6280.14,2010 cw(c6325.92,2010) 6293.55,2042.37 ; v1(6282,1486) 6282,1457 6255,1430 ; v1(6298.52,1609.37) 6315.67,1626.52 C163.1@6315.67,1670 ; v1@6298.52,1614.87 ccw(c6298.52,1628.15) 6307.91,1618.76 ccw(c6317.3,1609.37) v1@6304.02,1609.37 ; C163.1@6311.56,1665.89 cw(c6301.64,1655.97) 6315.67,1655.97 cw(c6329.7,1655.97) C163.1@6319.78,1665.89 ; v1@6312.64,2603.15 cw(c6303.25,2593.76) 6316.52,2593.76 cw(c6329.8,2593.76) 6320.41,2603.15 cw(c6329.55,2594.02) 6329.55,2606.94 ; v1@6320.41,2610.93 ccw(c6330.06,2620.57) 6330.06,2606.94 ; R259.2@6326.26,2075.08 cw(c6336.18,2065.16) 6336.18,2079.19 cw(c6336.18,2031.24) v1@6370.09,2065.14 ; R259.2@6327.45,2076.27 ccw(c6319.21,2084.51) R259.2@6330.86,2084.51 ; R259.2@6336.18,2091.19 cw(c6336.18,2072.21) 6349.6,2085.63 ; R259.2@6338.94,2079.96 cw(c6346.8,2067.03) 6357.5,2077.73 ; R259.2@6339.94,2081.24 cw(c6349.02,2072.16) 6349.02,2085 cw(c6349.02,2097.84) R259.2@6339.94,2088.76 ; U61.53@6351.52,2566.71 6316.52,2566.71 6316.52,2567.57 ; U61.44@6351.93,2390.4 6388.55,2390.4 6391.58,2387.37 v1(6433.19,2387.37) ; U61.55@6351.93,2606.94 v1@6316.52,2606.94 ; U61.63@6351.93,2764.42 6375,2764.42 ; v1@6363.02,2066.71 ccw(c6349.75,2066.71) 6359.14,2076.1 ccw(c6368.52,2085.49) v1@6368.52,2072.21 ; U61.63@6364.67,2764.42 ccw(c6364.67,2796.9) v1@6387.64,2773.93 ; U61.63@6365.13,2764.42 ccw(c6366.86,2783.81) v1@6380.62,2770.04 ; v1@6386.43,2772.11 cw(c6375,2776.75) 6375,2764.42 ; v1@6394.86,2766.71 v1(6391.52,2770.04) v1@6380.62,2770.04 ; v1@6411.3,2487.26 ccw(c6401.91,2496.65) 6415.19,2496.65 ccw(c6428.47,2496.65) v1@6419.08,2487.26 ; v1(6415.19,2483.37) 6415.19,2525 6410.19,2530 6410.19,2545.71 6389.19,2566.71 6389.19,2566.9 6388.52,2567.57 U61.53@6351.93,2567.57 6316.52,2567.57 ; v1@6429.3,2383.49 ccw(c6419.91,2374.1) 6419.91,2387.37 ccw(c6419.91,2400.65) v1@6429.3,2391.26 ; C242.2@6495.89,1514.78 ccw(c6485.97,1524.7) 6500,1524.7 ccw(c6514.03,1524.7) C242.2@6504.11,1514.78 ; v4@6495.89,1540.89 cw(c6485.97,1530.97) 6500,1530.97 cw(c6514.03,1530.97) v4@6504.11,1540.89 ; C246.2@6495.89,1664.78 ccw(c6469.42,1691.25) 6506.86,1691.25 ; C241.2@6495.89,1814.78 ccw(c6485.97,1824.7) 6500,1824.7 ccw(c6514.03,1824.7) C241.2@6504.11,1814.78 ; U48.8@6497.8,2990.43 6532.63,2990.43 6531.97,2991.1 6531.97,3016.02 ; U48.7@6497.8,3016.02 6531.97,3016.02 ; U48.6@6497.8,3041.61 6531.97,3041.61 ; v4(6500,1545) C242.2@6500,1510.67 C242.2@6502.19,1508.48 ; C241.2@6500,1810.67 6500,1833.37 6500.19,1833.37 ; C245.2@6500,1960.67 6511.86,1960.67 ; C240.2@6500,2104.86 cw(c6500,2090.83) 6509.92,2100.75 cw(c6519.84,2110.67) C240.2@6505.81,2110.67 ; C240.2@6500,2110.67 6522.19,2088.48 v1(6522.19,2000) ; v4@6500.89,2650.89 cw(c6490.97,2640.97) 6505,2640.97 cw(c6519.03,2640.97) v4@6509.11,2650.89 ; v4@6500.89,2659.11 ccw(c6490.97,2669.03) 6505,2669.03 ccw(c6519.03,2669.03) v4@6509.11,2659.11 ; C202.2@6501.1,2588.27 ccw(c6486.6,2615) 6517.01,2615 ccw(c6547.41,2615) C202.2@6532.92,2588.27 ; v5@6501.63,5953.48 6501.73,5953.37 v5(6501.73,5949.34) ; C245.2@6503.37,1955.94 cw(c6509.87,1946.83) 6517.79,1954.74 ; C224.2@6504.11,2256.56 cw(c6514.03,2246.64) 6514.03,2260.67 cw(c6514.03,2274.7) C224.2@6504.11,2264.78 ; C245.2@6504.59,1957.11 cw(c6511.86,1951.48) 6511.86,1960.67 ; C245.2@6504.59,1964.23 ccw(c6511.86,1969.86) 6511.86,1960.67 ; v4@6506.86,2653.14 v4(6505,2655) ; C246.2@6509.74,1650.82 ccw(c6500,1641.08) C246.2@6500,1654.86 ; C246.2@6509.99,1650.57 cw(c6520.09,1660.67) 6505.81,1660.67 ccw(c6519.84,1660.67) 6509.92,1650.75 ccw(c6500,1640.83) C246.2@6500,1654.86 ; C189.2@6510.18,2693.4 cw(c6508.43,2685) 6517.01,2685 ; C202.2@6517.01,2555 6517.01,2615 6505,2627.01 v4(6505,2655) ; C189.2@6517.01,2730 6517.01,2685 ; 6517.71,1647.52 ccw(c6500,1629.81) C246.2@6500,1654.86 ; v1@6518.3,2003.89 ccw(c6508.91,2013.28) 6522.19,2013.28 ccw(c6535.47,2013.28) v1@6526.08,2003.89 ; 6518.77,2260.67 cw(c6518.77,2239.02) v1@6538.42,2248.1 ; U48.8@6523.74,2991.06 ccw(c6503.88,3010.92) 6531.97,3010.92 ; U48.7@6523.74,3015.39 cw(c6503.88,2995.53) 6531.97,2995.53 ; U48.7@6523.74,3016.65 ccw(c6503.88,3036.52) 6531.97,3036.52 ; U48.6@6523.74,3040.99 cw(c6503.88,3021.12) 6531.97,3021.12 ; C189.2@6523.83,2693.4 ccw(c6525.59,2685) 6517.01,2685 ; U48.6@6524.38,3042.5 ccw(c6524.55,3062.55) 6538.73,3048.37 ; U48.8@6524.6,2989.57 cw(c6527.84,2977.38) 6536.77,2986.3 ; U48.8@6524.66,2989.59 cw(c6528.29,2979.15) 6536.1,2986.97 ; v1@6527.53,2243.07 ccw(c6500,2230.34) C224.2@6500,2260.67 6529.33,2260.67 6532.52,2257.48 v1(6532.52,2245.37) ; v1@6542.3,5454.49 cw(c6532.93,5445.12) 6546.18,5445.12 ; R130.1@6542.42,5414.25 ccw(c6533.34,5423.33) 6546.18,5423.33 ccw(c6559.02,5423.33) R130.1@6549.94,5414.25 ; R130.1@6546.18,5410 v1(6546.19,5458.37) ; 6546.18,5445.07 cw(c6559.49,5445.07) v1@6550.08,5454.49 ; v1(6554.52,4650.04) 6560.23,4655.75 U17.34@6619.41,4655.75 ; v1@6558.41,4646.15 cw(c6581.58,4622.98) 6581.58,4655.75 ; v1(6578.52,1339.37) 6565.19,1352.71 6565.19,1488.37 6531.86,1521.71 6531.86,1558.37 6548.52,1575.04 6565.19,1575.04 6581.86,1591.71 6581.86,1625.04 6565.19,1641.71 6523.52,1641.71 C246.2@6506.86,1658.37 ; SW3.3@6586.21,1085.25 ccw(c6558.04,1113.42) 6597.87,1113.42 ccw(c6637.71,1113.42) SW3.3@6609.54,1085.25 ; SW3.3@6597.87,1073.58 6597.87,1124.37 6614.87,1141.37 6615.19,1141.37 6631.86,1158.04 6631.86,1160.71 v1(6637.86,1166.71) 6673.29,1202.14 6673.29,1337.37 C221.2@6655.67,1355 ; v1@6609.69,3026.37 ccw(c6596.41,3026.37) 6605.8,3035.76 ccw(c6615.19,3045.15) v1@6615.19,3031.87 ; v1(6615.19,3026.37) 6593.19,3048.37 6538.73,3048.37 ; Q8.3@6615.43,5241.18 ccw(c6605.16,5255.04) 6622.4,5255.04 ; U13.28@6619.41,3355.55 6670.7,3355.55 6683.52,3368.37 v1(6683.52,3375.71) ; U13.41@6619.41,3765 6645,3765 v1(6670,3790) ; U13.46@6619.41,3922.48 6663.52,3922.48 6665.19,3924.15 v1(6665.19,3941.71) ; U13.52@6619.41,4111.46 6655.86,4111.46 6667.52,4123.12 v1(6667.52,4158.37) 6650.86,4175.04 6623.52,4175.04 6623.52,4174.45 U13.54@6619.41,4174.45 ; Q8.3@6622.12,5231.76 cw(c6673.62,5233.27) 6637.19,5269.7 ; Q8.3@6622.4,5230.79 6622.4,5255.04 ; 6626.58,1152.77 ccw(c6612.64,1166.71) v1@6632.36,1166.71 ; Q8.3@6629.38,5241.18 cw(c6639.65,5255.04) 6622.4,5255.04 ; Q8.3@6634.11,5232.11 cw(c6711.84,5234.39) v1@6656.85,5289.37 ; U13.41@6636.97,3769 ccw(c6636.97,3798.05) 6657.51,3777.51 ; U13.54@6636.97,4170.45 cw(c6636.97,4125.83) v1@6668.52,4157.38 ; U13.54@6636.97,4182.45 cw(c6636.97,4166.8) 6648.03,4177.87 ; v1@6637.86,1172.21 ccw(c6637.86,1185.49) 6647.25,1176.1 ccw(c6656.64,1166.71) v1@6643.36,1166.71 ; U13.54@6638.78,4170.88 cw(c6646.31,4156.02) 6658.1,4167.8 ; U13.54@6639.8,4171.62 cw(c6648.05,4163.36) 6648.05,4175.04 ; 6639.93,5272.44 ccw(c6612.33,5300.04) v1@6651.36,5300.04 ; C221.2@6655.67,1349.19 cw(c6655.67,1335.16) 6665.59,1345.08 cw(c6675.51,1355) C221.2@6661.48,1355 ; C215.2@6655.67,2375.04 v1@6702.52,2375.04 ; v1(6656.86,5300.04) v1@6656.86,5289.37 ; C215.2@6659.78,2370.89 cw(c6669.8,2360.87) 6669.8,2375.04 ; C215.2@6659.78,2379.11 ccw(c6669.6,2388.93) 6669.6,2375.04 ; v1@6661.3,3937.82 cw(c6651.91,3928.43) 6665.19,3928.43 cw(c6678.47,3928.43) v1@6669.08,3937.82 ; v1@6662.02,4158.37 ccw(c6648.75,4158.37) 6658.13,4167.76 ccw(c6667.52,4177.15) v1@6667.52,4163.87 ; v1@6663.64,4154.49 cw(c6654.25,4145.1) 6667.52,4145.1 cw(c6680.8,4145.1) v1@6671.41,4154.49 ; v1@6664.5,3790 cw(c6651.22,3790) 6660.61,3780.61 cw(c6670,3771.22) v1@6670,3784.5 ; v1@6672.93,4737.11 ccw(c6688.48,4752.67) 6688.48,4730.67 ; 6674.37,3359.22 ccw(c6663.6,3369.99) v1@6678.24,3374.19 ; v1(6677.52,4741.71) 6688.56,4730.67 C80.2@6735,4730.67 6768.52,4697.14 6768.52,4616.37 v1(6767.19,4615.04) ; 6678.79,2375.04 cw(c6678.79,2346.97) v1@6698.64,2366.82 ; v1@6681.41,4745.6 ccw(c6717.45,4781.64) 6717.45,4730.67 ; v1@6694.64,4616.15 cw(c6685.25,4606.76) 6698.52,4606.76 cw(c6711.8,4606.76) v1@6702.41,4616.15 ; v1(6698.52,4620.04) 6698.52,4595.04 6703.6,4589.96 C83.2@6735,4589.96 ; v1(6723.19,3552.71) 6723.19,3545.18 6740,3528.37 C68.2@6740,3495.51 ; v1@6728.68,3552.33 ccw(c6754.64,3550.54) 6736.24,3532.14 ; C84.2@6730.89,4403.81 cw(c6720.97,4393.89) 6735,4393.89 cw(c6749.03,4393.89) C84.2@6739.11,4403.81 ; C83.2@6730.89,4585.85 ccw(c6720.97,4575.94) 6720.97,4589.96 ccw(c6720.97,4603.99) C83.2@6730.89,4594.07 ; C80.2@6730.89,4726.56 ccw(c6720.97,4716.64) 6720.97,4730.67 ccw(c6720.97,4744.7) C80.2@6730.89,4734.78 ; C84.2@6735,4407.92 6735,4391.71 6743.33,4383.37 6748.52,4383.37 v1(6748.52,4335.04) ; C80.2@6735,4724.86 cw(c6735,4710.83) 6744.92,4720.75 cw(c6754.84,4730.67) C80.2@6740.81,4730.67 ; C79.2@6735,4830.04 6735,4822.56 v1(6768.19,4789.37) ; C68.2@6735.89,3499.62 ccw(c6725.97,3509.54) 6740,3509.54 ccw(c6754.03,3509.54) C68.2@6744.11,3499.62 ; C67.2@6740,3678.11 6764.26,3678.11 6777.52,3691.37 6777.52,3816 6789.52,3827.99 6791.24,3827.99 ; C66.2@6740,3860.16 6774.31,3860.16 6777.52,3856.94 6777.52,3841.71 6791.24,3827.99 ; C65.2@6740,4028.67 cw(c6740,4014.65) 6749.92,4024.57 cw(c6759.84,4034.48) C65.2@6745.81,4034.48 ; C65.2@6740,4034.48 6759.11,4015.37 6759.19,4015.37 v1(6766.19,4008.37) 6774.78,4016.97 U12.6@6845.59,4016.97 ; C79.2@6740.81,4830.04 ccw(c6772.88,4830.04) 6750.2,4807.36 ; C67.2@6744.11,3674 cw(c6754.03,3664.08) 6754.03,3678.11 cw(c6754.03,3692.14) C67.2@6744.11,3682.22 ; C66.2@6744.11,3856.05 cw(c6754.03,3846.13) 6754.03,3860.16 cw(c6754.03,3874.19) C66.2@6744.11,3864.27 ; v1@6744.64,4338.93 ccw(c6735.25,4348.32) 6748.52,4348.32 ccw(c6761.8,4348.32) v1@6752.41,4338.93 ; 6756.66,4017.82 ccw(c6766.19,4027.35) v1@6766.19,4013.87 ; 6756.86,4017.63 cw(c6747.61,4008.37) v1@6760.69,4008.37 ; v1@6762.69,4789.37 ccw(c6749.41,4789.37) 6758.8,4798.76 ccw(c6768.19,4808.15) v1@6768.19,4794.87 ; v1@6763.3,4618.93 ccw(c6750.69,4631.54) 6768.52,4631.54 ; v1@6770.08,4004.49 cw(c6800.21,3974.35) 6800.21,4016.97 ; v1@6788.3,2965.93 ccw(c6778.91,2975.32) 6792.19,2975.32 ccw(c6805.47,2975.32) v1@6796.08,2965.93 ; SW8.1@6790,110.71 6890,110.71 6990,110.71 7090,110.71 7190,110.71 SW8.6@7290,110.71 ; v1(6792.19,2962.04) 6792.19,2980.71 6791.46,2981.44 6791.46,3016.46 U34.7@6820,3016.46 ; SW8.1@6793,98.5 cw(c6822.49,69.01) 6822.49,110.71 ; SW8.1@6801.49,90.01 cw(c6851.46,40.04) 6851.46,110.71 ; C237.2@6801.56,1350.89 cw(c6791.64,1340.97) 6805.67,1340.97 cw(c6819.7,1340.97) C237.2@6809.78,1350.89 ; v1@6801.78,1323.41 ccw(c6792.39,1332.8) 6805.67,1332.8 ccw(c6818.95,1332.8) v1@6809.56,1323.41 ; v1@6805.67,1319.33 v1(6805.67,1319.52) C237.2@6805.67,1355 ; C231.2@6805.67,2375 v1(6845,2375) C196.2@6914.33,2375 ; C231.2@6809.78,2370.89 cw(c6819.7,2360.97) 6819.7,2375 ; C231.2@6809.78,2379.11 ccw(c6819.7,2389.03) 6819.7,2375 ; 6828.54,110.71 cw(c6828.54,40.04) SW8.2@6878.51,90.01 ; v1@6841.11,2371.11 ccw(c6831.72,2361.72) 6831.72,2375 ccw(c6831.72,2388.28) v1@6841.11,2378.89 ; U16.12@6845.59,4624.25 6878.52,4624.25 6880.86,4626.58 6880.86,4633.37 6890.19,4642.71 v1(6890.19,4658.37) ; v1@6848.89,2371.11 cw(c6858.28,2361.72) 6858.28,2375 cw(c6858.28,2388.28) v1@6848.89,2378.89 ; 6857.51,110.71 cw(c6857.51,69.01) SW8.2@6887,98.5 ; 6873.34,3827.99 ccw(c6873.34,3869.89) v1@6902.97,3840.26 ; SW8.2@6893,98.5 cw(c6922.49,69.01) 6922.49,110.71 ; v1(6900,1310) 6914.33,1324.33 C198.2@6914.33,1355 ; SW8.2@6901.49,90.01 cw(c6951.46,40.04) 6951.46,110.71 ; v1(6906.86,3836.37) 6898.47,3827.99 U12.12@6845.59,3827.99 6791.24,3827.99 ; C198.2@6910.22,1350.89 cw(c6900.3,1340.97) 6914.33,1340.97 cw(c6928.36,1340.97) C198.2@6918.44,1350.89 ; C196.2@6910.22,2370.89 ccw(c6900.3,2360.97) 6900.3,2375 ccw(c6900.3,2389.03) C196.2@6910.22,2379.11 ; 6928.54,110.71 cw(c6928.54,40.04) SW8.3@6978.51,90.01 ; C123.1@6945.67,2965 6988.86,2965 7003.52,2950.33 7003.52,2950.04 ; C123.1@6949.78,2960.89 cw(c6959.7,2950.97) 6959.7,2965 ; C123.1@6949.78,2969.11 ccw(c6959.7,2979.03) 6959.7,2965 ; 6957.51,110.71 cw(c6957.51,69.01) SW8.3@6987,98.5 ; SW8.3@6993,98.5 cw(c7022.49,69.01) 7022.49,110.71 ; 6995.47,2958.39 cw(c6976.08,2939) v1@7003.5,2939 ; SW8.3@7001.49,90.01 cw(c7051.46,40.04) 7051.46,110.71 ; 7028.54,110.71 cw(c7028.54,40.04) SW8.4@7078.51,90.01 ; 7049.37,2258.7 7049.37,2288.22 7115.57,2354.43 7119.52,2358.37 7125,2358.37 7130.67,2358.37 C197.2@7130.67,2375 ; 7057.51,110.71 cw(c7057.51,69.01) SW8.4@7087,98.5 ; SW4.3@7075.37,1073.19 7116.04,1073.19 ; SW8.4@7078.51,112.98 ccw(c7050.78,140.71) 7090,140.71 ccw(c7129.22,140.71) SW8.4@7101.49,112.98 ; 7083.43,2322.28 cw(c7125,2280.71) v1@7125,2339.5 ; SW8.4@7084.65,116.83 ccw(c7082.01,124.37) 7090,124.37 ; v1@7086.11,335.96 cw(c7076.72,326.57) 7090,326.57 cw(c7103.28,326.57) v1@7093.89,335.96 ; v1@7091.19,1225.87 cw(c7091.19,1212.6) 7100.58,1221.99 cw(c7109.97,1231.37) v1@7096.69,1231.37 ; v1(7091.19,1231.37) 7124.52,1198.04 7124.52,1081.67 7116.04,1073.19 ; SW8.4@7093,98.5 cw(c7122.49,69.01) 7122.49,110.71 ; v1@7093.52,343.37 7090,339.85 7090,124.37 ; SW4.3@7094.18,1062.78 cw(c7116.04,1045.02) 7116.04,1073.19 ; SW4.3@7094.18,1083.59 ccw(c7116.04,1101.36) 7116.04,1073.19 ; SW8.4@7095.35,116.83 cw(c7097.99,124.37) 7090,124.37 ; SW8.4@7101.49,90.01 cw(c7151.46,40.04) 7151.46,110.71 ; Q11.3@7102.22,2645.02 cw(c7113.21,2631.9) 7125.31,2644 ; Q11.3@7102.3,2645.07 cw(c7111.77,2621.11) 7129.99,2639.32 ; Q11.3@7102.4,2645.79 7123.52,2645.79 ; 7103.92,2342.77 cw(c7125,2321.68) v1@7125,2351.5 ; C199.2@7105.67,1355 7154.23,1355 v1(7154.52,1354.71) ; C199.2@7109.78,1350.89 cw(c7119.7,1340.97) 7119.7,1355 ; C199.2@7109.78,1359.11 ccw(c7119.7,1369.03) 7119.7,1355 ; Q11.3@7109.92,2635.82 cw(c7121.66,2621.81) 7134.58,2634.73 ; Q11.3@7112.34,2639.58 cw(c7123.52,2632.61) 7123.52,2645.79 ; Q11.3@7112.34,2651.99 ccw(c7123.52,2658.97) 7123.52,2645.79 ; 7118.32,2357.17 ccw(c7102.37,2373.11) C197.2@7124.87,2374.61 ; v1@7121.11,2348.89 ccw(c7098.04,2371.96) C197.2@7130.67,2371.96 ; 7122.26,2361.12 ccw(c7113.88,2369.5) C197.2@7125.15,2373.19 ; C197.2@7126.56,2370.89 cw(c7116.64,2360.97) 7130.67,2360.97 cw(c7144.7,2360.97) C197.2@7134.78,2370.89 ; 7128.54,110.71 cw(c7128.54,40.04) SW8.5@7178.51,90.01 ; U35.7@7130,3016.46 7163.52,3016.46 7163.52,2976.71 v1(7198.52,2941.71) 7206.86,2950.04 7206.86,2950.33 7216.52,2960 ; 7140.54,1355 cw(c7140.54,1340.72) v1@7150.64,1350.82 ; 7141.95,1355 ccw(c7141.95,1367.28) v1@7150.64,1358.6 ; U35.7@7156.48,3016.46 cw(c7139.48,2999.45) 7163.52,2999.45 ; 7157.51,110.71 cw(c7157.51,69.01) SW8.5@7187,98.5 ; SW8.5@7193,98.5 cw(c7222.49,69.01) 7222.49,110.71 ; v1@7193.02,2941.71 ccw(c7179.75,2941.71) 7189.14,2951.1 ccw(c7198.52,2960.49) 7198.52,2947.21 ccw(c7198.52,2959.78) 7207.41,2950.89 ; SW8.5@7201.49,90.01 cw(c7251.46,40.04) 7251.46,110.71 ; v1@7204.02,2941.71 cw(c7218.01,2941.71) 7208.12,2951.6 ; 7210.12,2953.6 cw(c7219.07,2944.65) C125.1@7226.1,2955.17 ; C125.1@7224.96,2956.17 ccw(c7216.52,2948.79) 7216.52,2960 ; C125.1@7224.96,2963.83 cw(c7216.52,2971.2) 7216.52,2960 ; 7228.54,110.71 cw(c7228.54,40.04) SW8.6@7278.51,90.01 ; C125.1@7229.33,2960 7216.52,2960 ; 7250.26,4096.44 cw(c7276.85,4069.85) U12.52@7276.85,4107.46 ; v1@7250.97,1327.26 ccw(c7239.62,1338.61) 7255.67,1338.61 ; C223.2@7251.56,1350.89 cw(c7241.64,1340.97) 7255.67,1340.97 cw(c7269.7,1340.97) C223.2@7259.78,1350.89 ; v1(7254.86,1323.37) 7255.67,1324.19 C223.2@7255.67,1355 ; C217.2@7255.67,2375 7275.19,2375 7290.19,2390 ; 7257.51,110.71 cw(c7257.51,69.01) SW8.6@7287,98.5 ; 7259.4,4105.58 cw(c7268.77,4096.22) U12.52@7274.98,4107.92 ; C217.2@7259.78,2370.89 cw(c7269.7,2360.97) 7269.7,2375 cw(c7269.7,2389.03) C217.2@7259.78,2379.11 ; 7265.76,4175.04 cw(c7265.76,4163.36) U12.54@7274.02,4171.62 ; SW8.6@7278.51,112.98 ccw(c7250.78,140.71) 7290,140.71 ccw(c7329.22,140.71) SW8.6@7301.49,112.98 ; v1@7286.11,161.11 cw(c7276.72,151.72) 7290,151.72 cw(c7303.28,151.72) v1@7293.89,161.11 ; SW8.6@7290,75.71 SW8.6@7290,110.71 ; v1(7290,165) SW8.6@7290,110.71 ; 7290.19,2389.04 7290.19,2390 ; SW8.6@7293,98.5 cw(c7322.49,69.01) 7322.49,110.71 ; U12.28@7294.41,3355.55 7345.7,3355.55 7373.52,3383.37 v1(7390.19,3383.37) 7440.19,3433.37 7440.19,3489.04 7433.72,3495.51 C70.2@7385,3495.51 ; U12.41@7294.41,3765 7311.96,3765 v1@7401.9,3765 ; U12.46@7294.41,3922.48 7367.22,3922.48 7385,3904.7 C64.2@7385,3860.16 ; U12.52@7294.41,4111.46 7265.19,4111.46 7265.19,4111.37 7253.86,4100.04 7232.86,4100.04 7224.52,4108.37 7224.52,4139.04 7260.52,4175.04 7294.41,4175.04 7298.52,4175.04 U12.54@7298.52,4174.45 ; U12.54@7294.41,4174.45 U12.54@7298.52,4174.45 ; U16.34@7294.41,4655.75 7334.15,4655.75 v1(7346.52,4643.37) ; SW8.6@7301.49,90.01 cw(c7351.46,40.04) 7351.46,110.71 ; U16.34@7303.37,4655.75 cw(c7303.37,4600.23) v1@7342.64,4639.49 ; 7328.54,110.71 cw(c7328.54,40.04) SW8.7@7378.51,90.01 ; 7332.35,4655.75 cw(c7332.35,4629.2) v1@7351.12,4647.97 ; 7352.35,3362.2 cw(c7390.19,3324.36) v1@7390.19,3377.87 ; 7357.51,110.71 cw(c7357.51,69.01) SW8.7@7387,98.5 ; 7365.19,3375.04 cw(c7378.78,3361.46) v1@7387.65,3378.5 ; 7372.84,3382.69 cw(c7390.19,3365.33) v1@7390.19,3389.87 ; 7376.76,3386.61 cw(c7386.7,3376.67) v1@7393.19,3389.14 ; C63.2@7380.89,3723.56 ccw(c7370.97,3733.48) 7385,3733.48 ccw(c7399.03,3733.48) C63.2@7389.11,3723.56 ; C64.2@7380.89,3864.27 ccw(c7370.97,3874.19) 7385,3874.19 ccw(c7399.03,3874.19) C64.2@7389.11,3864.27 ; C69.2@7380.89,4079.93 ccw(c7370.97,4089.85) 7385,4089.85 ccw(c7399.03,4089.85) C69.2@7389.11,4079.93 ; C81.2@7380.89,4403.81 cw(c7370.97,4393.89) 7385,4393.89 cw(c7399.03,4393.89) C81.2@7389.11,4403.81 ; C85.2@7380.89,4734.78 ccw(c7370.97,4744.7) 7385,4744.7 ccw(c7399.03,4744.7) C85.2@7389.11,4734.78 ; C86.2@7381.33,4594.47 ccw(c7375.06,4602.18) 7385,4602.18 ; C63.2@7385,3719.45 7385,3745.04 ; C69.2@7385,4075.82 7385,4121.52 7413.52,4150.04 v1(7440.19,4150.04) v1(7440.19,4150.04) 7415.86,4174.45 U12.54@7298.52,4174.45 ; C81.2@7385,4407.92 7385,4385.04 7386.67,4383.37 7398.52,4383.37 7418.19,4363.71 v1(7418.19,4359.04) ; C86.2@7385,4589.96 7385,4602.18 ; C85.2@7385,4724.86 cw(c7385,4710.83) 7394.92,4720.75 cw(c7404.84,4730.67) C85.2@7390.81,4730.67 ; C85.2@7385,4733.14 cw(c7438.76,4733.14) v1@7400.75,4771.15 ; 7385,4762.11 cw(c7409.79,4762.11) v1@7392.26,4779.64 ; C82.2@7385,4871.38 7419.86,4871.38 7423.52,4871.37 ; 7385.19,3745.04 v1(7403.52,3763.37) ; v1@7386.3,3379.49 ccw(c7376.91,3370.1) 7376.91,3383.37 ccw(c7376.91,3396.65) v1@7386.3,3387.26 ; 7386.32,3765 cw(c7386.32,3746.17) v1@7399.64,3759.49 ; C86.2@7388.67,4594.47 cw(c7394.95,4602.18) 7385,4602.18 ; C70.2@7389.11,3491.41 cw(c7399.03,3481.49) 7399.03,3495.51 cw(c7399.03,3509.54) C70.2@7389.11,3499.62 ; C82.2@7389.11,4867.27 cw(c7399.03,4857.35) 7399.03,4871.38 cw(c7399.03,4885.41) C82.2@7389.11,4875.49 ; C184.2@7389.99,2695.33 cw(c7381.69,2675.71) 7402.99,2675.71 ; v1@7390.19,3388.87 ccw(c7390.19,3402.15) 7399.58,3392.76 ccw(c7408.97,3383.37) v1@7395.69,3383.37 ; C201.2@7390.51,2589.89 ccw(c7383.06,2608.37) 7402.99,2608.37 ; C64.2@7390.79,3865.95 7406.7,3850.04 v1(7431.86,3850.04) ; C86.2@7390.81,4589.96 cw(c7434.34,4589.96) 7403.56,4620.75 ; SW8.7@7393,98.5 cw(c7422.49,69.01) 7422.49,110.71 ; C201.2@7395.98,2563.9 cw(c7414.91,2529.25) 7442.83,2557.17 ; v1(7396.86,4775.04) 7388.52,4775.04 7385,4771.52 C85.2@7385,4730.67 7406.86,4708.81 7406.86,4703.04 v1(7433.86,4676.04) 7433.86,4651.04 7385,4602.18 ; v1@7398.02,3763.37 cw(c7384.75,3763.37) 7394.14,3753.99 cw(c7403.52,3744.6) v1@7403.52,3757.87 ; SW8.7@7401.49,90.01 cw(c7451.46,40.04) 7451.46,110.71 ; C233.2@7401.56,2379.11 ccw(c7391.64,2389.03) 7405.67,2389.03 ccw(c7419.7,2389.03) C233.2@7409.78,2379.11 ; C201.2@7401.73,2553.37 cw(c7422.92,2514.59) 7454.16,2545.84 ; v1@7402.36,2407.37 ccw(c7389.08,2407.37) 7398.47,2416.76 ccw(c7407.86,2426.15) v1@7407.86,2412.87 ; C184.2@7402.99,2730 7402.99,2675.71 ; 7405.5,4376.4 cw(c7388.15,4359.04) v1@7412.69,4359.04 ; C239.2@7405.67,1349.19 cw(c7405.67,1335.16) 7415.59,1345.08 cw(c7425.51,1355) C239.2@7411.48,1355 ; C239.2@7405.67,1355 7431.86,1328.81 v1(7431.86,1308.37) ; C233.2@7405.67,2375 7405.67,2399.71 v1@7413.34,2407.37 ; 7405.67,2388.81 cw(c7426.42,2388.81) v1@7411.75,2403.49 ; C201.2@7407.48,2542.84 cw(c7430.92,2499.93) 7465.5,2534.5 ; v1@7413.3,4923.82 cw(c7388.62,4899.14) 7423.52,4899.14 ; v1@7413.67,2407.71 v1@7413.34,2407.37 ; C201.2@7415.47,2589.89 cw(c7422.93,2608.37) 7402.99,2608.37 ; C184.2@7416,2695.33 ccw(c7424.3,2675.71) 7402.99,2675.71 ; v1(7417.19,4927.71) 7423.52,4921.37 7423.52,4871.37 ; v1@7427.97,1312.26 ccw(c7418.58,1321.65) 7431.86,1321.65 ccw(c7445.14,1321.65) v1@7435.75,1312.26 ; v1@7427.97,3846.15 ccw(c7418.58,3836.76) 7418.58,3850.04 ccw(c7418.58,3863.32) v1@7427.97,3853.93